# Altium PCB MONO65_DB_A1.PcbDoc
Units mm, origin at the board's own origin, x right, y up, seen from the top; angles counter-clockwise.
Board outline 18 x 16.5 mm, 2 copper layers (Component Side, Solder Side), stack 1.586 mm thick; 13 components, 8 nets, 40 pads, 13 vias.
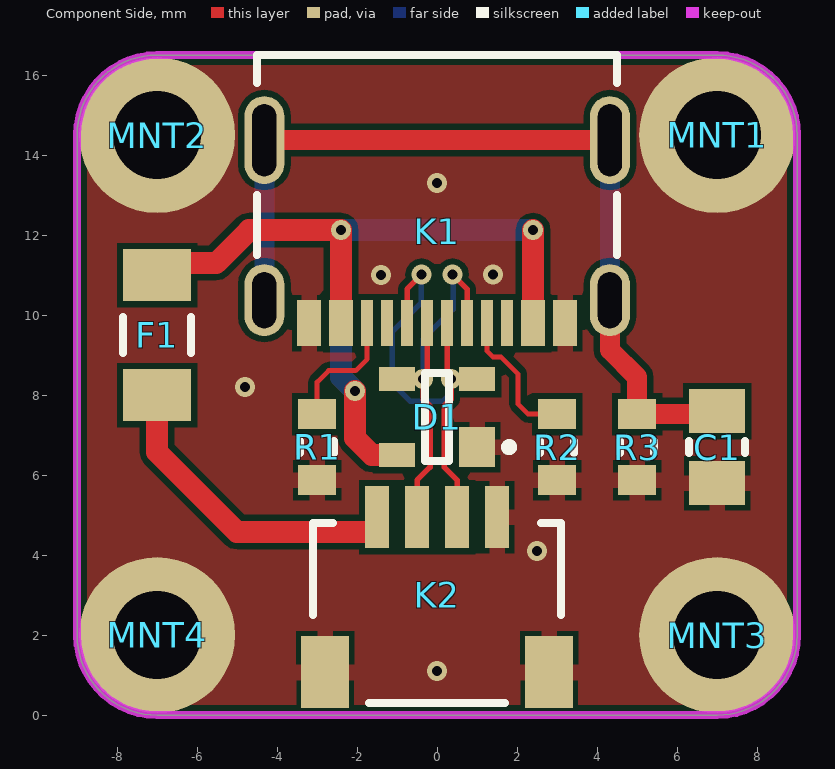
[diagram p0: Component Side view]
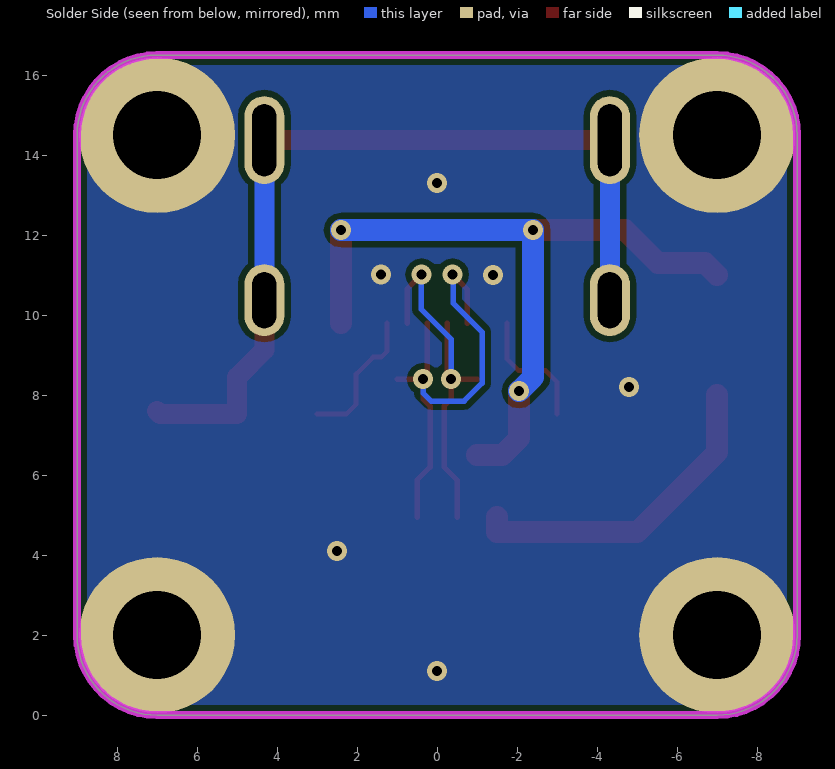
[diagram p1: Solder Side view, seen from below]

## Layer stack, top to bottom
Top Solder: solder mask 0.0102, Solder Resist, Dk 3.5
Component Side: signal copper 0.018
Dielectric 3: core 1.55, Core-009, Dk 4.5
Solder Side: signal copper 0.018
Bottom Solder: solder mask 0.0102, Solder Resist, Dk 3.5

## Board outline
-9,2 -9,14.5 cw(c-7,14.5) -7,16.5 7,16.5 cw(c7,14.5) 9,14.5 9,2 cw(c7,2) 7,0 -7,0 cw(c-7,2)

## Design rules (kind name [scope] priority, off if disabled: settings)
Clearance Clearance_FIDs [(InComponent('FID1') OR InComponent('FID2') OR InComponent('FID3') OR InComponent('FID4') OR InComponent('FID5') OR InComponent('FID6')) vs (InPolygon AND OnLayer('Component Side') OR OnLayer('Solder Side'))] p1: gap=0.5 ignorepadtopadclearanceinfootprint=FALSE
Clearance [All] p2: gap=0.15 ignorepadtopadclearanceinfootprint=TRUE
ComponentClearance [All] p1 off: gap=0.254 collisioncheckmode=3 verticalgap=0.254 showdistances=FALSE
DiffPairsRouting DiffPair_90_USB_DiffPairsRouting [InDifferentialPairClass('DIFF_90Ohm_USB')] p1: maxlimit=0.2 minlimit=0.2 mostfreqgap=0.2 toplayer_minwidth=0.135 toplayer_maxwidth=0.135 toplayer_prefwidth=0.135 bottomlayer_minwidth=0.135 bottomlayer_maxwidth=0.135 bottomlayer_prefwidth=0.135 maxuncoupledlength=12.7
DiffPairsRouting [All] p2: maxlimit=0.254 minlimit=0.254 mostfreqgap=0.254 toplayer_minwidth=0.381 toplayer_maxwidth=0.381 toplayer_prefwidth=0.381 bottomlayer_minwidth=0.381 bottomlayer_maxwidth=0.381 bottomlayer_prefwidth=0.381 maxuncoupledlength=12.7
Height [All] p1 off: minheight=0 maxheight=25.4 prefheight=12.7
HoleSize [All] p1: absolutevalues=TRUE maxlimit=5 minlimit=0.15 maxpercent=80.000 minpercent=20.000
MatchedLengths DiffPair_100_HDMI_MatchedLengths [InDifferentialPairClass('DIFF_100Ohm_HDMI')] p1: tolerance=0.15 checknetsindiffpair=TRUE checkdiffpairvsdiffpair=FALSE checkxsignals=FALSE checkothers=FALSE
MatchedLengths DiffPair_100_ETH_MatchedLengths [InDifferentialPairClass('DIFF_100Ohm_ETHERNET')] p2: tolerance=0.15 checknetsindiffpair=TRUE checkdiffpairvsdiffpair=FALSE checkxsignals=FALSE checkothers=FALSE
MatchedLengths DiffPair_100_DSI_MatchedLengths [InDifferentialPairClass('DIFF_100Ohm_DSI')] p3: tolerance=0.15 checknetsindiffpair=TRUE checkdiffpairvsdiffpair=FALSE checkxsignals=FALSE checkothers=FALSE
MatchedLengths DiffPair_90_USB_MatchedLengths [InDifferentialPairClass('DIFF_90Ohm_USB')] p4: tolerance=0.15 checknetsindiffpair=TRUE checkdiffpairvsdiffpair=FALSE checkxsignals=FALSE checkothers=FALSE
MinimumSolderMaskSliver [All] p1: minsoldermaskwidth=0.127
PlaneClearance [All] p1: clearance=0.2
PlaneConnect PlaneConnect_Via [IsVia] p1: planeconnectstyle=Direct reliefexpansion=0.508 reliefentries=4 reliefconductorwidth=0.254 reliefairgap=0.254
PlaneConnect [All] p2: pad.planeconnectstyle=Relief pad.reliefexpansion=0.5 pad.reliefentries=4 pad.reliefconductorwidth=0.75 pad.reliefairgap=0.15 via.planeconnectstyle=Direct via.reliefexpansion=0.5 via.reliefentries=4 via.reliefconductorwidth=0.75 via.reliefairgap=0.25
PolygonConnect PolygonConnect_MNT_HOLES_M2 [(InComponent('MNT1') OR InComponent('MNT2') OR InComponent('MNT3') OR InComponent('MNT4'))] p1: connectstyle=Direct reliefconductorwidth=1 reliefentries=4 polygonreliefangle="90 Angle" airgapwidth=0.15
PolygonConnect PolygonConnect_Any_net_All_layers [InNetClass('All Nets')] p2: thpad.connectstyle=Relief thpad.reliefconductorwidth=0.4 thpad.reliefentries=4 thpad.polygonreliefangle="90 Angle" thpad.airgapwidth=0.125 smdpad.connectstyle=Relief smdpad.reliefconductorwidth=0.4 smdpad.reliefentries=4 smdpad.polygonreliefangle="90 Angle" smdpad.airgapwidth=0.125 via.connectstyle=Direct via.reliefconductorwidth=1 via.reliefentries=4 via.polygonreliefangle="90 Angle" via.airgapwidth=0.15
RoutingVias [All] p1: holewidth=0.3 width=0.55 viastyle="Through Hole" minholewidth=0.25 minwidth=0.5 maxholewidth=0.3 maxwidth=0.55
SolderMaskExpansion [All] p1: expansion=0.102
UnRoutedNet [All] p1: checkbadconnections=TRUE
Width [All] p1: maxlimit=20 minlimit=0.125 preferedwidth=0.5 minimp=50.000000 maximp=50.000000 favimp=50.000000
22 further rules are at their usual default settings.

## Classes and differential pairs
differential pair class DIFF_90Ohm_USB: PC_USB
net class USB: PC_USB_N PC_USB_P
component class "MONO65_DB_A1_s03 [Connection]": C1 D1 F1 K1 K2 MNT1 MNT2 MNT3 MNT4 R1 R2 R3
differential pair PC_USB: +PC_USB_P -PC_USB_N

## Components (designator, comment, footprint, x,y, rotation, side; value= is the part's Value field where it differs from the comment)
C1 "4n7 1kV" CAPC2012X12N 7,6.7 r270 top
D1 "PRTR5V0U2X,215" SOT143B290X130-4N 0,7.45 r180 top
Designator8 "Comment" "TITLE BLOCK A3" -195.299,-137.878 r0 top locked
F1 "1.1A 16VDC PTC" PTC3116X06N -7,9.5 r270 top
K1 "USB-C" USB-TYP-C-2.0-217179-0001 0,9.8 r180 top
K2 "SM04B-SRSS-TB" SM04B-SRSS-TB 0,2.5 r0 top
MNT1 "MNT-M2-PL" MNT-M2-PL 7,14.5 r0 top
MNT2 "MNT-M2-PL" MNT-M2-PL -7,14.5 r0 top
MNT3 "MNT-M2-PL" MNT-M2-PL 7,2 r0 top
MNT4 "MNT-M2-PL" MNT-M2-PL -7,2 r0 top
R1 "5k1 1%" RESC1608X04N -3,6.7 r270 top
R2 "5k1 1%" RESC1608X04N 3,6.7 r270 top
R3 "1M 1%" RESC1608X04N 5,6.7 r270 top

## Footprints (in the part's own frame and the unit in brackets; to place one, negate y for a bottom-side part, rotate by r counter-clockwise, add the part's x,y. Pads: shape width x height; smd on the part's side, far side on the other; paste and mask are expansions set on the pad)
CAPC2012X12N [mm] "Chip Capacitor, 2-Leads, Body 2,00x1,25mm, IPC Medium Density"
  rect 1.1x1.4 smd: 1(-0.9,0) 2(0.9,0)
  silkscreen extent -0.15,-0.7 0.15,0.7, body extent -1.05,-0.67 1.05,0.67, height 1.25
MNT-M2-PL [mm] "Mounting hole M2 Plated"
  round 3.9 hole 2.2: 1(0,0)
PTC3116X06N [mm] "PTC Fuse, 2-Leads, Body 3,10x1,60mm, IPC Medium Density"
  rect 1.3x1.7 smd: 1(-1.5,0) 2(1.5,0)
  silkscreen extent -0.45,-0.85 0.45,0.85, body extent -1.7,-0.85 1.7,0.85, height 0.8
RESC1608X04N [mm] "Chip Resistor, 2-Leads, Body 1,60x0,80mm, IPC Medium Density"
  rect 0.75x0.95 smd: 1(-0.825,0) 2(0.825,0)
  silkscreen extent -0.15,-0.43 0.15,0.43, body extent -0.8,-0.4 0.8,0.4, height 0.45
SM04B-SRSS-TB [mm] "SMD Header, 1mm, Side Entry, 4-pin"
  rect 1.2x1.8 smd: 0(-2.8,-1.425) 0(2.8,-1.425)
  rect 0.6x1.55 smd: 1(-1.5,2.45) 2(-0.5,2.45) 3(0.5,2.45) 4(1.5,2.45)
  silkscreen extent -3.1,-2.2 3.1,2.3, body extent -3,-2.09 3,2.86, height 2.96
SOT143B290X130-4N [mm] "SOT23, 5-Leads, Body 2,9x1,3mm, Pitch 1,9mm, IPC Medium Density"
  rect 0.9x1 smd: 1(-1,0.75)
  rect 0.9x0.6 smd: 2(-1,-0.95) 3(1,-0.95) 4(1,0.95)
  silkscreen extent -1.9,-1.1 0.3,1.1, body extent -1.21,-1.46 1.21,1.46, height 1
"TITLE BLOCK A3" [mm] "Title block A3"
USB-TYP-C-2.0-217179-0001 [mm] "Molex 217179-0001 USB Type C SMD connector"
  oval 1x1.8 hole 0.6 slot 1.4 at 90 deg: 0(-4.32,-0.575) 0(4.32,-0.575)
  oval 1x2.2 hole 0.6 slot 1.8 at 90 deg: 0(-4.32,-4.575) 0(4.32,-4.575)
  rect 0.6x1.15 smd: A1(-3.2,0) A4(-2.4,0) B1(3.2,0) B4(2.4,0)
  rect 0.3x1.15 smd: A5(-1.25,0) A6(-0.25,0) A7(0.25,0) A8(1.25,0) B5(1.75,0) B6(0.75,0) B7(-0.75,0) B8(-1.75,0)
  silkscreen extent -4.5,-6.7 4.5,-1.7, body extent -4.47,-6.7 4.47,0.05, height 3.25

## Part data
C1: library part "CAP SMD CER 4.7n 1kV X7R 0805", "SMD CAPACITOR, 4.7n, 1kV, X7R, 0805", Capacitance=4.7nF, Case/Package=0805, Case Code (Metric)=2012, Dielectric=X7R, Dielectric Material=Ceramic, Manufacturer=KEMET, Manufacturer Part Number=C0805C472KDRACTU, Max Operating Temperature=125°C, Min Operating Temperature=-55°C, Package Quantity=1, Supplier Part Number 1=3299100, Tolerance=10%, Voltage Rating=1kV, Voltage Rating (DC)=1.5kV, Case Code (Imperial)=0805, ComponentLink1Description=https://datasheet.ciiva.com/5409/kem-c1010-x7r-hv-smd-5409114.pdf?src-supplier=Mouser, ComponentLink1URL=https://datasheet.ciiva.com/5409/kem-c1010-x7r-hv-smd-5409114.pdf?src-supplier=Mouser, Depth=1.25mm, Height=1.25mm, Length=2mm, Mount="Surface Mount", Packaging="Tape and Reel", Pricing 1="2500 = 0,05000 (EUR)", RoHS=Yes, RoHS Compliant=Yes, Series=C, Stock 1=5000, Supplier 1=Farnell, Termination=SMD/SMT, Thickness=0.055inch, Width=1.2mm
D1: library part "SEM TVS 5.5V DUAL SOT143B PRTR5V0U2X,215", "TVS ESD DIODE - PRTR5V0U2X - Ultra low capacitance double rail-to-rail ESD protection diode", Case/Package=SOT143B, Manufacturer=Nexperia, Supplier Part Number 1=1727-3884-6-ND, ComponentLink1Description=http://www.farnell.com/datasheets/109718.pdf?src-supplier=Farnell, ComponentLink1URL=http://www.farnell.com/datasheets/109718.pdf?src-supplier=Farnell, ComponentLink2Description=https://assets.nexperia.com/documents/data-sheet/PRTR5V0U2X.pdf?src-supplier=Digi-Key, ComponentLink2URL=https://assets.nexperia.com/documents/data-sheet/PRTR5V0U2X.pdf?src-supplier=Digi-Key, ComponentLink3Description=http://www.farnell.com/datasheets/109718.pdf?src-supplier=Newark, ComponentLink3URL=http://www.farnell.com/datasheets/109718.pdf?src-supplier=Newark, Manufacturer Part Number=PRTR5V0U2X,215, Pricing 1="1 = 0,54000, 10 = 0,46100, 100 = 0,34400, 500 = 0,27028, 1000 = 0,20886 (USD)", RoHS=Yes, RoHS Compliant=Yes, Stock 1=430, Supplier 1=Digi-Key
F1: library part "FUS FUS 1206 16VDC 1.1A PTC 1206L110/16WR", "PTC Resettable Fuse 1.1A(hold) 2.2A(trip) 16VDC 100A 0.8W 0.1sek 0.06Ohm SMD 1206", Case/Package=1206, Case Code (Metric)=3216, Hold Current=1.1A, Manufacturer=Littelfuse, Manufacturer Part Number=1206L110/16WR, Max Current Rating=100A, Package Quantity=3000, Supplier Part Number 1=18-1206L110/16WRCT-ND, Trip Current=2.2A, Case Code (Imperial)=1206, ComponentLink1Description=http://www.mouser.com/ds/2/240/Littelfuse_PTC_1206L_Datasheet.pdf-477012.pdf?src-supplier=Mouser, ComponentLink1URL=http://www.mouser.com/ds/2/240/Littelfuse_PTC_1206L_Datasheet.pdf-477012.pdf?src-supplier=Mouser, ComponentLink2Description=http://www.littelfuse.com/~/media/electronics/datasheets/resettable_ptcs/littelfuse_ptc_1206l_datasheet.pdf.pdf?src-supplier=Digi-Key, ComponentLink2URL=http://www.littelfuse.com/~/media/electronics/datasheets/resettable_ptcs/littelfuse_ptc_1206l_datasheet.pdf.pdf?src-supplier=Digi-Key, Packaging="Tape and Reel", Pricing 1="1 = 0,97000, 5 = 0,93600, 10 = 0,87600, 50 = 0,72500, 100 = 0,60420, 250 = 0,58908, 500 = 0,49846, 1000 = 0,43804 (USD)", RoHS=Yes, Stock 1=3391, Supplier 1=Digi-Key, Time to Trip=0.1s
K1: library part "CON B2W HYB 217179-0001", "USB2.0 Type-C 24P SMD Right Angle SMD", Manufacturer=Molex, Manufacturer Part Number=217179-0001, Supplier Part Number 1=35AJ1973, Pricing 1="1 = 0,77500, 25 = 0,71100, 100 = 0,62500, 250 = 0,56900, 500 = 0,51100, 1000 = 0,46800 (USD)", RoHS=No, Stock 1=1200, Supplier 1=Avnet
K2: library part "CON B2W HYB B2B SM04B-SRSS-TB", "4pin PHD 1mm SMD JST - SM04B-SRSS-TB - Pin Header, Wire-to-Board, 1 Rows, 4 Contacts, SR Series", Flammability Rating="UL94 V-0", Housing Color=Natural, Manufacturer=JST, Max Operating Temperature=85°C, Min Operating Temperature=-25°C, Supplier Part Number 1=455-1422-1-ND, Voltage Rating=50V, ComponentLink1Description=https://media.digikey.com/pdf/Data%20Sheets/JST%20PDFs/SR%20Connector.pdf?src-supplier=Digi-Key, ComponentLink1URL=https://media.digikey.com/pdf/Data%20Sheets/JST%20PDFs/SR%20Connector.pdf?src-supplier=Digi-Key, Connector Type="Header,Male Pin", Contact Material="Copper Alloy", Contact Plating=Tin,Lead, Contact Shape=Square, Fastening Type=Push,Pull, Gender=Male, Housing Material=Nylon, Insulation Color=Natural, Insulation Height=0.114inch, Insulation Material=Nylon, Lead Free="Contains Lead", Manufacturer Part Number=SM04B-SRSS-TB, Mount="Surface Mount", Number of Positions=4, Number of Rows=1, Orientation=Horizontal, Packaging="Cut Tape", REACH SVHC="No SVHC", RoHS=Yes, Stock 1=0, Supplier 1=Digi-Key, Termination=Solder
MNT1 MNT2 MNT3 MNT4: library part "MNH M2 PL", "Mounting Hole M2 Plated"
R1 R2: library part "RES SMD 5.1k 1% 0603", "SMD RESISTOR 5.1k 1% 0603 0.1W", Case/Package=0603, Case Code (Metric)=1608, Manufacturer=Yageo, Manufacturer Part Number=RC0603FR-075K1L, Max Operating Temperature=155°C, Max Power Dissipation=100mW, Min Operating Temperature=-55°C, Package Quantity=1, Resistance=5.1kR, Resistance Tolerance=1%, Resistor Type="Thick Film", Supplier Part Number 1=3495881, Temperature Coefficient=100ppm/°C, Voltage Rating=50V, Case Code (Imperial)=0603, ComponentLink1Description=https://datasheet.ciiva.com/46395/443971-46395016.pdf?src-supplier=Element14, ComponentLink1URL=https://datasheet.ciiva.com/46395/443971-46395016.pdf?src-supplier=Element14, ComponentLink2Description=https://datasheet.ciiva.com/15189/getdatasheetpartid-326732-15189786.pdf?src-supplier=Verical, ComponentLink2URL=https://datasheet.ciiva.com/15189/getdatasheetpartid-326732-15189786.pdf?src-supplier=Verical, ComponentLink3Description=https://datasheet.ciiva.com/2454/pyu-r-int-thick-7-2454045.pdf?src-supplier=Digi-Key, ComponentLink3URL=https://datasheet.ciiva.com/2454/pyu-r-int-thick-7-2454045.pdf?src-supplier=Digi-Key, ComponentLink4Description=https://datasheet.ciiva.com/2454/pyu-r-int-thick-7-2454046.pdf?src-supplier=Digi-Key, ComponentLink4URL=https://datasheet.ciiva.com/2454/pyu-r-int-thick-7-2454046.pdf?src-supplier=Digi-Key, ComponentLink5Description=https://datasheet.ciiva.com/2454/pyu-r-int-thick-7-2454047.pdf?src-supplier=Digi-Key, ComponentLink5URL=https://datasheet.ciiva.com/2454/pyu-r-int-thick-7-2454047.pdf?src-supplier=Digi-Key, Construction=Rectangular, Depth=0.8mm, Features="Moisture Resistant", Height=0.022inch, Lead Free="Lead Free", Length=0.063inch, Military Standard=Not, Number of Pins=2, Number of Terminations=2, Packaging="Tape and Reel", Power Rating=100mW, Pricing 1="10 = 0,02100, 100 = 0,00900, 500 = 0,00650, 1000 = 0,00400, 2500 = 0,00350, 5000 = 0,00300, 25000 = 0,00290 (EUR)", REACH SVHC="No SVHC", RoHS=Yes, RoHS Compliant=Yes, Series=RC, Size Code=0603, Stock 1=28699, Supplier 1=Farnell, Termination=SMD/SMT, Tolerance=1%, Voltage Rating (DC)=50V, Width=0.031inch
R3: library part "RES SMD 1M 1% 0603", "SMD RESISTOR 1M 1% 0603 0.1W", Case/Package=0603, Case Code (Metric)=1608, Manufacturer=Yageo, Manufacturer Part Number=RC0603FR-071ML, Max Operating Temperature=155°C, Min Operating Temperature=-55°C, Package Quantity=5000, Power Rating=100mW, Resistance=1MR, Resistor Type="Thick Film", Supplier Part Number 1=311-1.00MHRCT-ND, Temperature Coefficient=100ppm/°C, Tolerance=1%, Voltage Rating=75V, Voltage Rating (DC)=50V, Application(s)="HIGH RELIABILITY", Case Code (Imperial)=0603, ComponentLink1Description=https://datasheet.ciiva.com/11819/0900766b80f96399-11819295.pdf?src-supplier=RSComponents, ComponentLink1URL=https://datasheet.ciiva.com/11819/0900766b80f96399-11819295.pdf?src-supplier=RSComponents, ComponentLink2Description=https://datasheet.ciiva.com/7983/443971-7983614.pdf?src-supplier=Element14, ComponentLink2URL=https://datasheet.ciiva.com/7983/443971-7983614.pdf?src-supplier=Element14, ComponentLink3Description=https://datasheet.ciiva.com/12555/rc0603-272842-12555388.pdf?src-supplier=Mouser, ComponentLink3URL=https://datasheet.ciiva.com/12555/rc0603-272842-12555388.pdf?src-supplier=Mouser, Depth=0.8mm, Height=0.45mm, Lead Free="Lead Free", Length=1.6mm, Military Standard=Not, Number of Pins=2, Packaging="Cut Tape", Pricing 1="1 = 0,10000, 10 = 0,02400, 100 = 0,00970, 1000 = 0,00436, 2500 = 0,00378 (USD)", REACH SVHC="No SVHC", RoHS=Yes, RoHS Compliant=Yes, Series=RC, Stock 1=4592219, Supplier 1=Digi-Key, Technology="THICK FILM", Termination=SMD/SMT, Type="General Purpose", Weight=0.000847oz, Width=0.8mm

## Via types
v1: diameter 0.5, hole 0.25, Component Side to Solder Side, tented both sides, 13 vias

## Nets (pads, with @x,y where several pads share a name; then routed paths per layer and width w, separated by ;. In a path a pad name is that pad's centre, name@x,y a point inside that pad or via, vN(x,y) a via of type N, cw(c..) or ccw(c..) an arc to the next point about the centre after c; other vN are vias at no path point)
5V_IN: D1.4 F1.1 K1.A4 K1.B4 | length 21.1
  Component Side w0.55: F1.1 -6.7,11.3 -5.525,11.3 -4.7,12.125 v1(-2.4,12.125) K1.B4 ; v1(-2.05,8.1) -2.05,6.925 -1.625,6.5 D1.4 ; K1.A4 v1(2.4,12.125)
  Solder Side w0.55: v1(-2.05,8.1) -2.4,8.45 v1(-2.4,12.125) v1(2.4,12.125)
5V_OUT: F1.2 K2.1 | length 8.1
  Component Side w0.55: F1.2 -7,6.575 -5,4.575 -1.5,4.575 K2.1
GND: C1.2 D1.1 K1.A1 K1.B1 K2.0 K2.4 MNT1.1 MNT2.1 MNT3.1 MNT4.1 R1.2 R2.2 R3.2
  other v1: 0,1.1 2.5,4.1 -4.8,8.2 -1.4,11 1.4,11.013 0,13.3
NetC1_1: C1.1 K1.0 R3.1 | length 21.8
  Component Side w0.5: K1.0@-4.32,14.375 K1.0@4.32,14.375 ; K1.0@4.32,10.375 4.32,9.13 5,8.45 R3.1 6.925,7.525 C1.1
  Solder Side w0.5: K1.0@-4.32,10.375 K1.0@-4.32,14.375 ; K1.0@4.32,10.375 K1.0@4.32,14.375
NetK1_A5: K1.A5 R2.1 | length 3.5
  Component Side w0.125: K1.A5 1.25,9.1 1.4,8.95 1.6,8.95 2.025,8.525 2.025,7.775 2.275,7.525 R2.1
NetK1_B5: K1.B5 R1.1 | length 3.2
  Component Side w0.125: R1.1 -3,8.325 -2.712,8.613 -2.037,8.613 -1.75,8.9 K1.B5
PC_USB_N: D1.3 K1.A7 K1.B7 K2.2 | length 10
  Component Side w0.135: D1.3 v1(-0.35,8.4) ; K2.2 -0.5,5.875 -0.175,6.2 -0.175,7.725 -0.35,7.9 v1(-0.35,8.4) ; K1.A7 -0.25,8.5 v1(-0.35,8.4) ; v1(0.387,11.013) 0.75,10.65 K1.B7
  Solder Side w0.135: v1(-0.35,8.4) -0.35,9.4 0.4,10.15 v1@0.4,11
PC_USB_P: D1.2 K1.A6 K1.B6 K2.3 | length 12.2
  Component Side w0.135: K1.B6 -0.75,10.65 v1(-0.387,11.013) ; K1.A6 0.25,8.5 v1(0.35,8.4) ; K2.3 0.5,5.875 0.175,6.2 0.175,7.725 0.35,7.9 v1(0.35,8.4) ; D1.2 v1(0.35,8.4)
  Solder Side w0.135: v1@-0.4,11 -0.4,10.3 -1.125,9.575 -1.125,8.3 -0.675,7.85 0.15,7.85 0.35,8.05 v1(0.35,8.4)
pads on no net: K1.A8 K1.B8

## Polygon pours and split planes (outlines as drawn)
GND on Component Side "GND_L01_P000" (solid, remove dead copper, pour order 0): -9,16.5 9,16.5 9,0 -9,0
GND on Solder Side "GND_L02_P002" (solid, remove dead copper, pour order 2): -9,0 9,0 9,16.5 -9,16.5

## Keep-outs
Keep-Out Layer:
  the board outline again, w0.2

## Silkscreen, mask and mechanical layers (free items; w line width, h text height)
Bottom Solder:
  drawing of 8 lines, arcs and shapes, not listed
  text "MONO65_DB / A1" at 3,14.5 h1
Mechanical 80:
  text "CLOSED SOURCE" at 135.701,-122.878 h2
  text "A1" at 175.701,-123.878 h2
Mechanical 81:
  text "CLOSED SOURCE" at -130.299,-122.878 h2
  text "A1" at -172.599,-123.878 h2
Mechanical 100:
  drawing of 585 lines, arcs and shapes, not listed

## Text inside footprints (layer, text, board x,y; h text height)
Designator8: Mechanical 80 "TOP SIDE" at 81.561,-115.878 h1.75; Mechanical 80 "www.aljaztitoric.com" at 49.701,-121.098 h1.5; Mechanical 80 "www.aljaztitoric.com" at 48.201,-117.598 h2; Mechanical 80 "VIEW SIDE:" at 80.291,-112.351 h1.14; Mechanical 80 "FILE NAME:" at 80.291,-127.718 h1.14; Mechanical 80 "TITLE:" at 118.391,-104.858 h1.14; Mechanical 80 "C" at -193.394,-34.576 h1.78; Mechanical 80 "8" at 173.178,140.633 h1.78; Mechanical 80 "REV:" at 171.731,-120.098 h1.14; Mechanical 80 "SCALE:" at 171.731,-127.718 h1.14; Mechanical 80 "8" at 173.178,-136.227 h1.78; Mechanical 80 "DATE:" at 80.291,-120.098 h1.14; Mechanical 80 "6" at 74.626,140.633 h1.78; Mechanical 80 "6" at 74.626,-136.227 h1.78; Mechanical 80 "5" at 25.604,140.633 h1.78; Mechanical 80 "5" at 25.604,-136.227 h1.78; Mechanical 80 "4" at -23.672,140.633 h1.78; Mechanical 80 "4" at -23.672,-136.227 h1.78; Mechanical 80 "2" at -122.224,140.633 h1.78; Mechanical 80 "2" at -122.224,-136.227 h1.78; Mechanical 80 "1" at -171.263,140.633 h1.78; Mechanical 80 "1" at -171.263,-136.227 h1.78; Mechanical 80 "A" at -193.394,106.648 h1.78; Mechanical 80 "B" at -193.394,36.036 h1.78; Mechanical 80 "D" at -193.394,-104.68 h1.78; Mechanical 80 "PCB DESIGNER:" at 80.291,-104.858 h1.14; Mechanical 80 "C" at 195.226,-34.576 h1.78; Mechanical 80 "A" at 195.226,106.648 h1.78; Mechanical 80 "B" at 195.226,36.036 h1.78; Mechanical 80 "D" at 195.226,-104.68 h1.78; Mechanical 80 "7" at 124.156,140.633 h1.78; Mechanical 80 "7" at 124.156,-136.227 h1.78; Mechanical 80 "3" at -72.964,140.633 h1.78; Mechanical 80 "3" at -72.964,-136.227 h1.78; Mechanical 80 "1:1 [A3]" at 175.701,-131.378 h2; Mechanical 81 "BOTTOM SIDE" at -78.459,-115.878 h1.75; Mechanical 81 "www.aljaztitoric.com" at -46.599,-121.098 h1.5; Mechanical 81 "www.aljaztitoric.com" at -45.099,-117.598 h2; Mechanical 81 "VIEW SIDE:" at -77.189,-112.351 h1.14; Mechanical 81 "FILE NAME:" at -77.189,-127.718 h1.14; Mechanical 81 "TITLE:" at -115.289,-104.858 h1.14; Mechanical 81 "C" at 196.496,-34.576 h1.78; Mechanical 81 "8" at -170.077,140.633 h1.78; Mechanical 81 "REV:" at -168.629,-120.098 h1.14; Mechanical 81 "SCALE:" at -168.629,-127.718 h1.14; Mechanical 81 "8" at -170.077,-136.227 h1.78; Mechanical 81 "DATE:" at -77.189,-120.098 h1.14; Mechanical 81 "6" at -71.525,140.633 h1.78; Mechanical 81 "6" at -71.525,-136.227 h1.78; Mechanical 81 "5" at -22.503,140.633 h1.78; Mechanical 81 "5" at -22.503,-136.227 h1.78; Mechanical 81 "4" at 26.773,140.633 h1.78; Mechanical 81 "4" at 26.773,-136.227 h1.78; Mechanical 81 "2" at 125.325,140.633 h1.78; Mechanical 81 "2" at 125.325,-136.227 h1.78; Mechanical 81 "1" at 174.364,140.633 h1.78; Mechanical 81 "1" at 174.364,-136.227 h1.78; Mechanical 81 "A" at 196.496,106.648 h1.78; Mechanical 81 "B" at 196.496,36.036 h1.78; Mechanical 81 "D" at 196.496,-104.68 h1.78; Mechanical 81 "PCB DESIGNER:" at -77.189,-104.858 h1.14; Mechanical 81 "C" at -192.124,-34.576 h1.78; Mechanical 81 "A" at -192.124,106.648 h1.78; Mechanical 81 "B" at -192.124,36.036 h1.78; Mechanical 81 "D" at -192.124,-104.68 h1.78; Mechanical 81 "7" at -121.055,140.633 h1.78; Mechanical 81 "7" at -121.055,-136.227 h1.78; Mechanical 81 "3" at 76.065,140.633 h1.78; Mechanical 81 "3" at 76.065,-136.227 h1.78; Mechanical 81 "1:1 [A3]" at -172.599,-131.378 h2